# EAGLE board smart_meter (EAGLE 9.6.2)
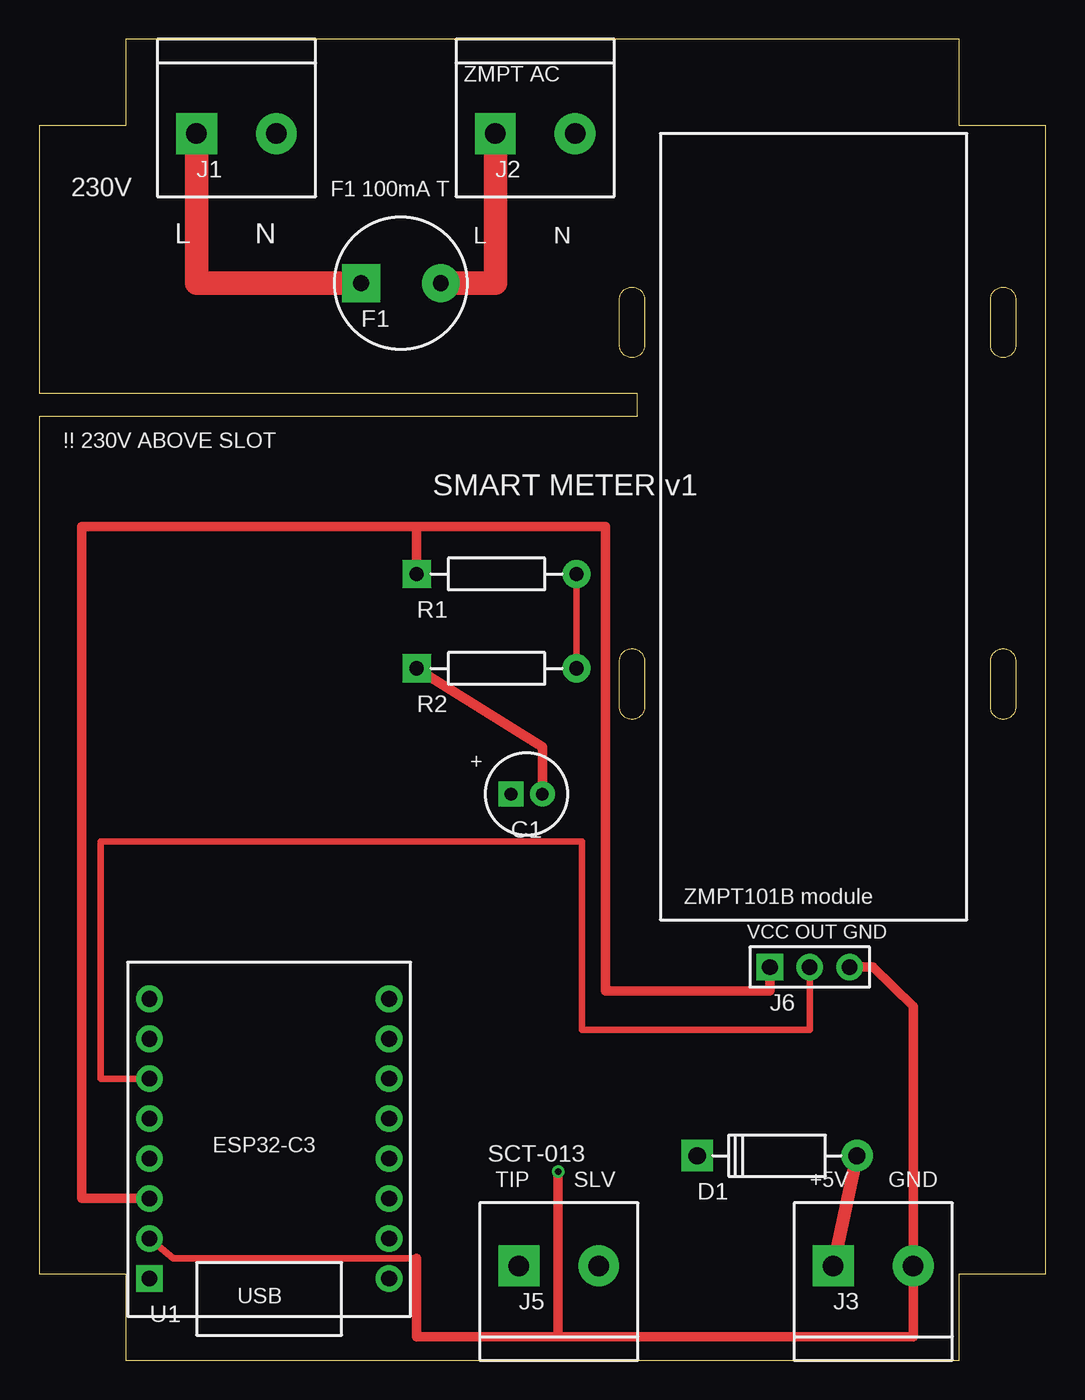
[diagram p0: board, top side]
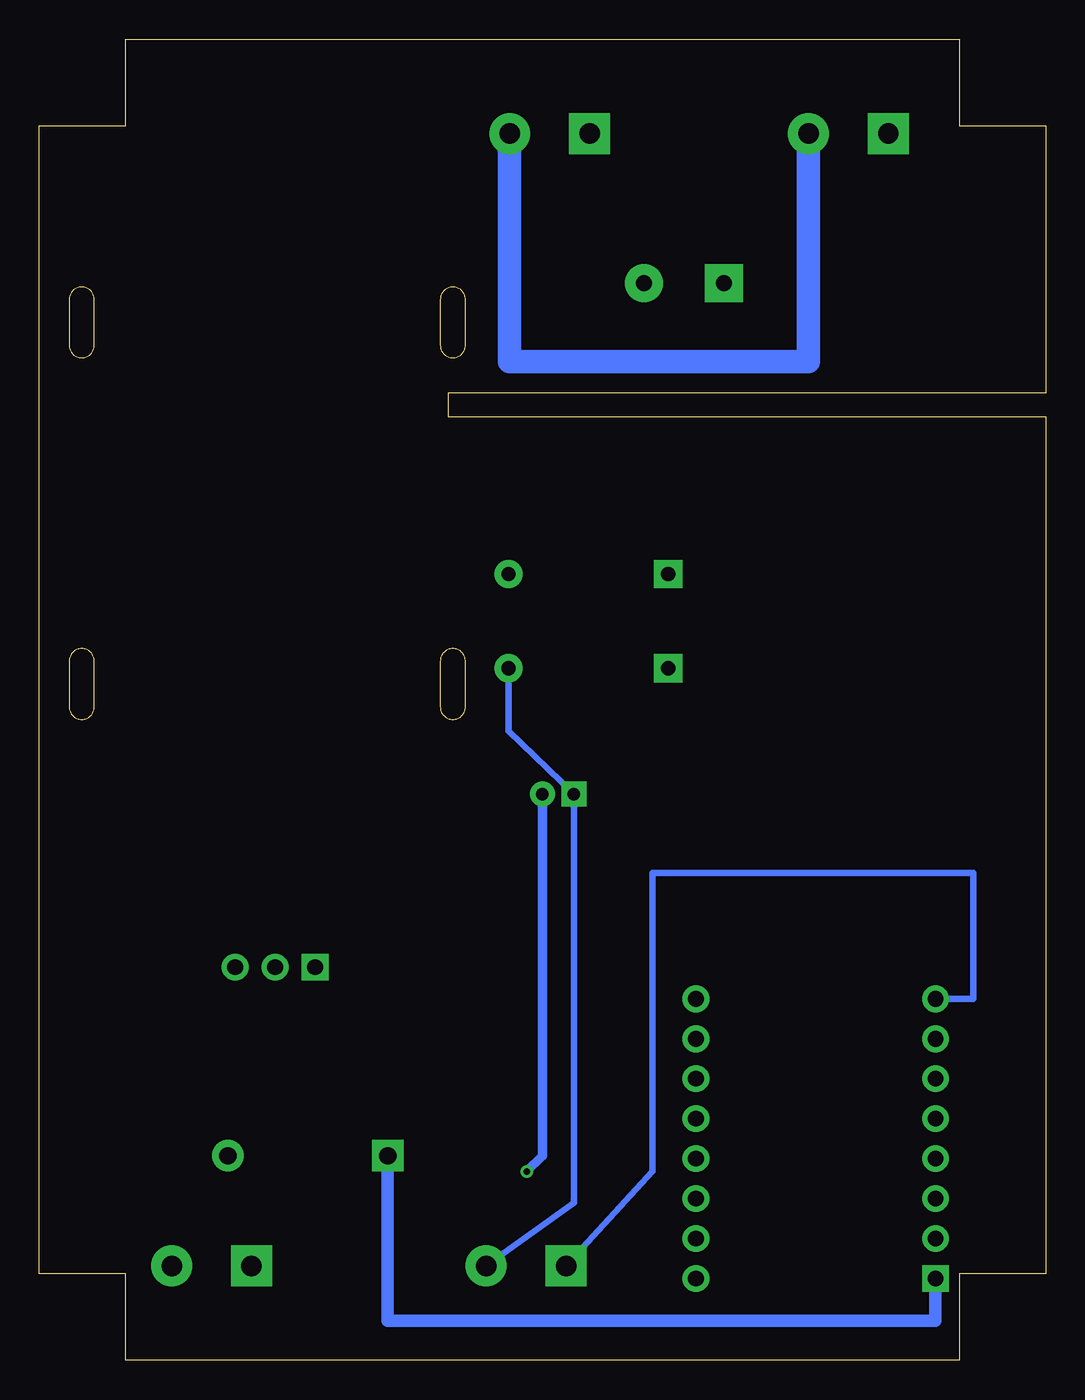
[diagram p1: board, bottom side, seen from below]

Size 64 x 84 mm. Coordinates in mm from the lower left corner, seen from the top.
Outline: 5.5,0 58.5,0 58.5,5.5 64,5.5 64,78.5 58.5,78.5 58.5,84 5.5,84 5.5,78.5 0,78.5 0,61.5 38,61.5 38,60 0,60 0,5.5 5.5,5.5 5.5,0
Outline: 36.9,41.55 36.9,44.45 arc-180 38.5,44.45 38.5,41.55 arc-180 36.9,41.55
Outline: 60.5,41.55 60.5,44.45 arc-180 62.1,44.45 62.1,41.55 arc-180 60.5,41.55
Outline: 36.9,64.55 36.9,67.45 arc-180 38.5,67.45 38.5,64.55 arc-180 36.9,64.55
Outline: 60.5,64.55 60.5,67.45 arc-180 62.1,67.45 62.1,64.55 arc-180 60.5,64.55
Copper layers used: Top, Bottom
Design rules "smart_meter": minimum track width 0.2mm, minimum drill 0.3mm, track to track 0.2mm, track to pad 0.2mm, pad to pad 0.2mm, copper to edge 0.4mm
Net classes: 1 mains: width 1.5 mm, clearance 3 mm
tRestrict: area 39.5,28 to 59,78; area 5,24.6 to 24.5,30
bRestrict: area 39.5,28 to 59,78; area 5,24.6 to 24.5,30

## Footprints (pad centres in the part's own frame; a part is rotated, then mirrored left to right if it is on the bottom)
CPOL_D5_P2 = drill 0.8 pad 1.6 square: + 0,0 | drill 0.8 pad 1.6: - 2,0
DO41_400 = drill 1.1 pad 2: A 10.16,0 | drill 1.1 pad 2 square: K 0,0
FUSE_TR5 = drill 1 pad 2.4 square: 1 0,0 | drill 1 pad 2.4: 2 5.08,0
TERM2_UP = drill 1.3 pad 2.6 square: 1 0,0 | drill 1.3 pad 2.6: 2 5.08,0
TERM2_DOWN = drill 1.3 pad 2.6 square: 1 0,0 | drill 1.3 pad 2.6: 2 5.08,0
HDR1X3 = drill 1 pad 1.7 square: 1 0,0 | drill 1 pad 1.7: 2 2.54,0; 3 5.08,0
R_AXIAL_400 = drill 0.9 pad 1.8 square: 1 0,0 | drill 0.9 pad 1.8: 2 10.16,0
ESP32C3_SUPERMINI = drill 1 pad 1.7: 3V3 0,5.08; GND 0,2.54; IO0 0,17.78; IO1 0,15.24; IO2 0,12.7; IO3 0,10.16; IO4 0,7.62; IO5 15.24,0; IO6 15.24,2.54; IO7 15.24,5.08; IO8 15.24,7.62; IO9 15.24,10.16; IO10 15.24,12.7; IO20 15.24,15.24; IO21 15.24,17.78 | drill 1 pad 1.7 square: 5V 0,0

## Placement (x,y rotation side)
C1  10uF  [CPOL_D5_P2]  30,36 0 top
D1  1N5819  [DO41_400]  41.84,13 0 top
F1  100mA T  [FUSE_TR5]  20.46,68.5 0 top
J1  230V L N  [TERM2_UP]  10,78 0 top
J2  ZMPT AC  [TERM2_UP]  29,78 0 top
J3  5V IN  [TERM2_DOWN]  50.5,6 0 top
J5  SCT-013  [TERM2_DOWN]  30.5,6 0 top
J6  ZMPT VCC OUT GND  [HDR1X3]  46.46,25 0 top
R1  10k  [R_AXIAL_400]  24,50 0 top
R2  10k  [R_AXIAL_400]  24,44 0 top
U1  ESP32-C3 SuperMini  [ESP32C3_SUPERMINI]  7,5.2 0 top

## Library data of the parts
C1 D1 F1 J1-J3 J5 J6 R1 R2 U1 = smart_meter

## Nets
+3V3: J6.1 R1.1 U1.3V3
+5V: D1.K U1.5V
+5V_IN: D1.A J3.1
ADC_I: J5.1 U1.IO0
ADC_V: J6.2 U1.IO2
BIAS: C1.+ J5.2 R1.2 R2.2
GND: C1.- J3.2 J6.3 R2.1 U1.GND
L_FUSED [mains]: F1.2 J2.1
L_IN [mains]: F1.1 J1.1
N [mains]: J1.2 J2.2

## Tracks (layer width: path | path; a pad name or v marks a point on that pad's centre or on a via)
+3V3
  Top 0.6: U1.3V3 2.7,10.28 2.7,53 36,53 36,23.5 46.46,23.5 J6.1 | 24,53 R1.1
+5V
  Bottom 0.8: D1.K 41.84,2.5 7,2.5 U1.5V
+5V_IN
  Top 0.8: J3.1 D1.A
ADC_I
  Bottom 0.4: U1.IO0 4.6,22.98 4.6,31 25,31 25,12 J5.1
ADC_V
  Top 0.4: U1.IO2 3.9,17.9 3.9,33 34.5,33 34.5,21 49,21 J6.2
BIAS
  Top 0.4: R1.2 R2.2
  Bottom 0.4: R2.2 34.16,40 C1.+ 30,10 J5.2
GND  (via drill 0.4 pad 0.8)
  Top 0.4: U1.GND 8.5,6.47 24,6.47
  Top 0.6: 24,6.47 24,1.5 55.58,1.5 J3.2 55.58,22.5 53,25 J6.3 | C1.- 32,39 R2.1 | v33,12 33,1.5
  Bottom 0.6: C1.- 32,13 v33,12
L_FUSED
  Top 1.5: F1.2 29,68.5 J2.1
L_IN
  Top 1.5: J1.1 10,68.5 F1.1
N
  Bottom 1.5: J1.2 15.08,63.5 34.08,63.5 J2.2

## Text on the board
tPlace: ZMPT AC | 230V | F1 100mA T | L | N | L | N | !! 230V ABOVE SLOT | SMART METER v1 | ZMPT101B module | VCC OUT GND | SCT-013 | TIP | SLV | +5V | GND